# Altium PCB GEARDRONE_F4_3.PcbDoc
Units mil, origin at the board's own origin, x right, y up, seen from the top; angles counter-clockwise.
Board outline 2820.03 x 2817.53 mil, 4 copper layers (Top Layer, GND, VCC, Bottom Layer), stack 33.578 mil thick; 89 components, 49 nets, 337 pads, 88 vias.
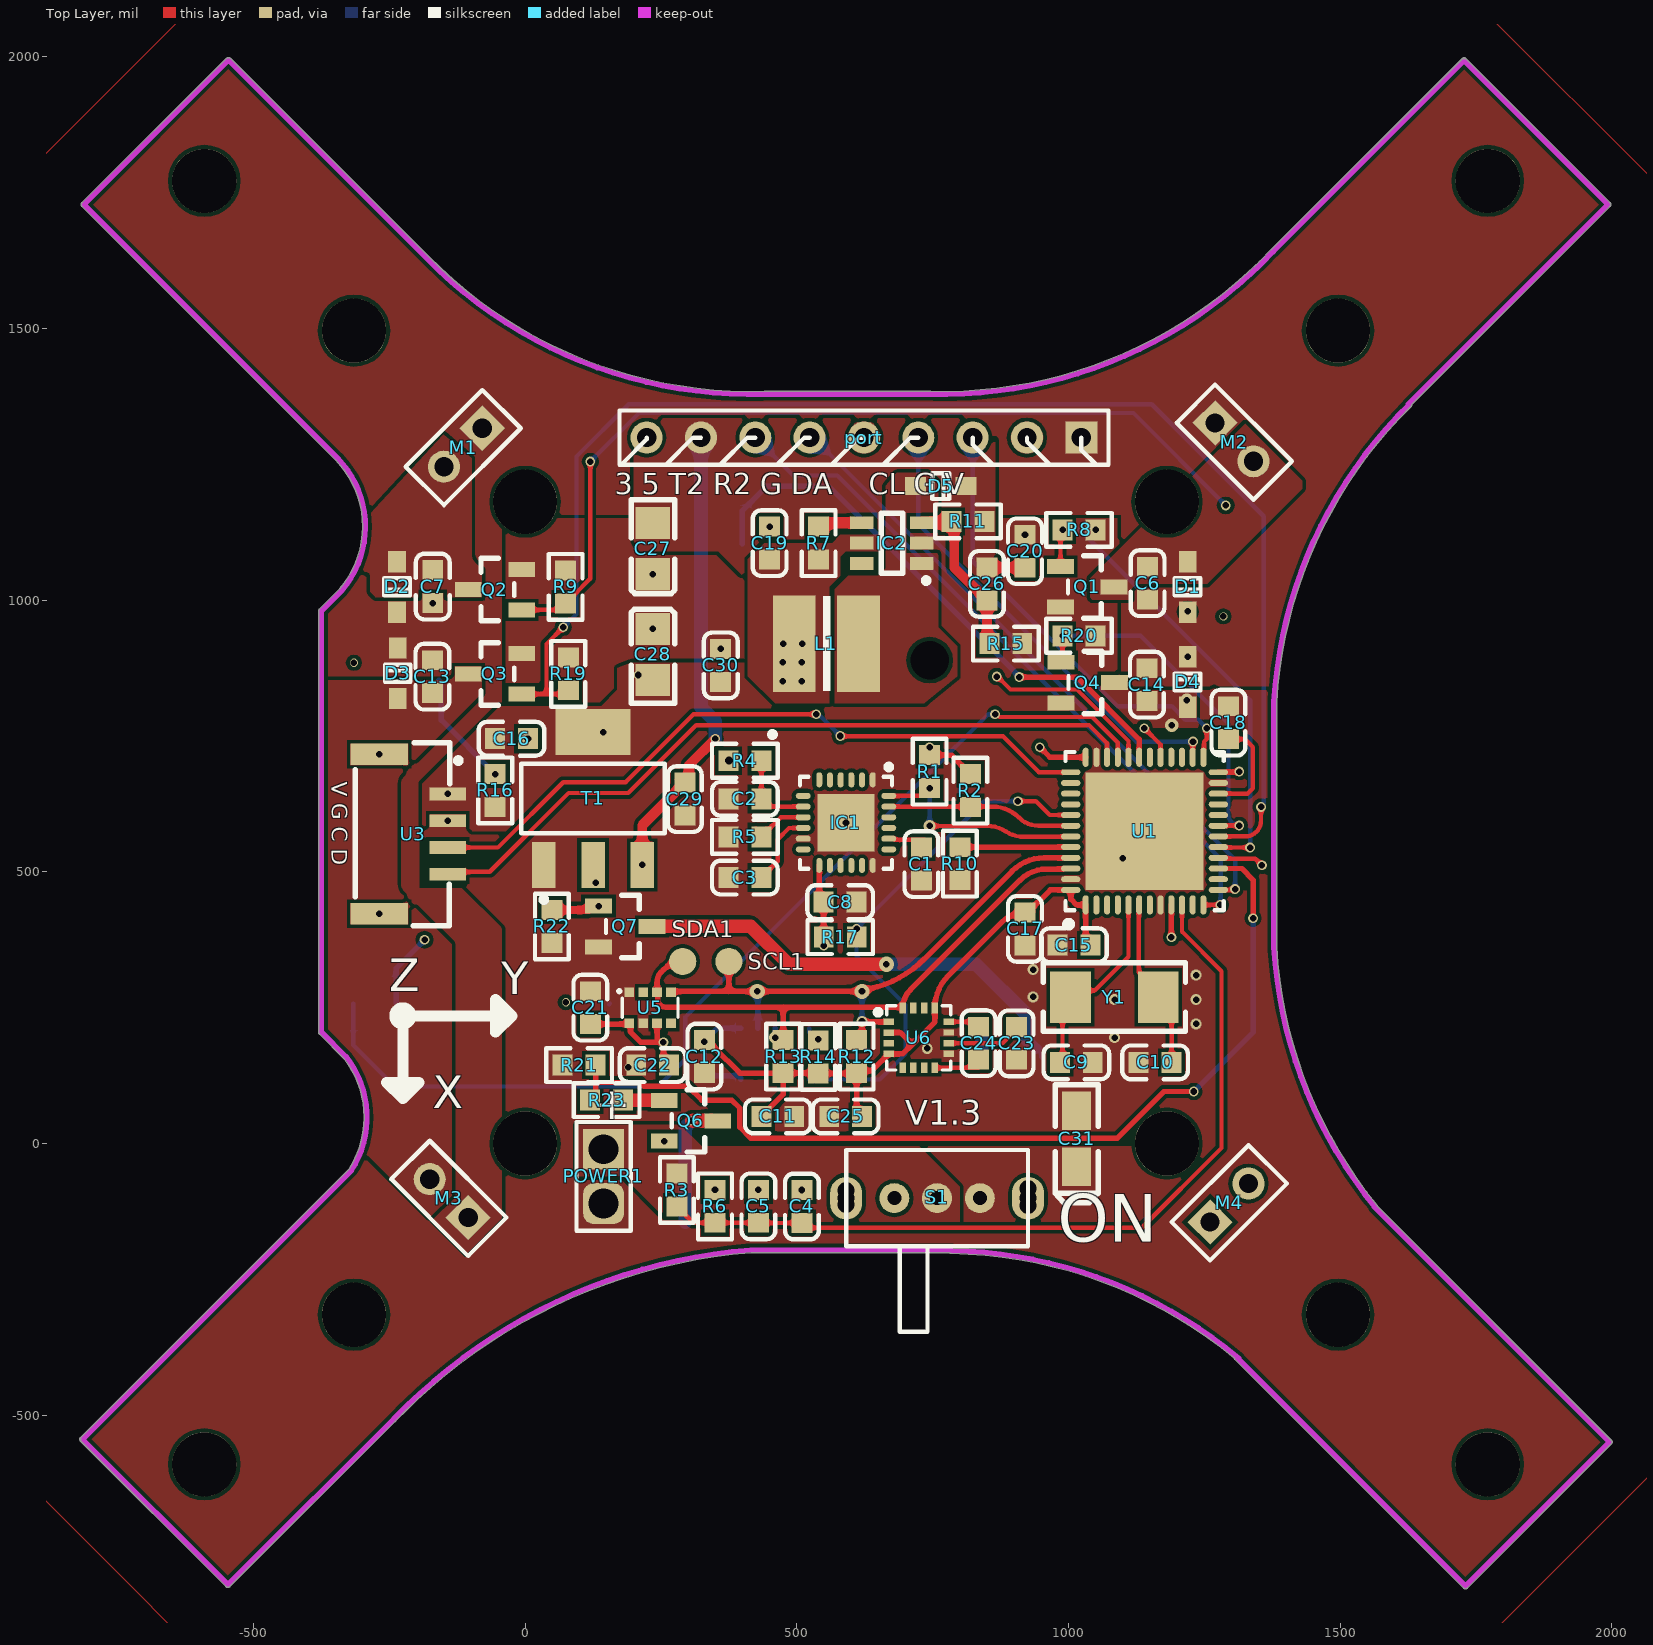
[diagram p0: Top Layer view]
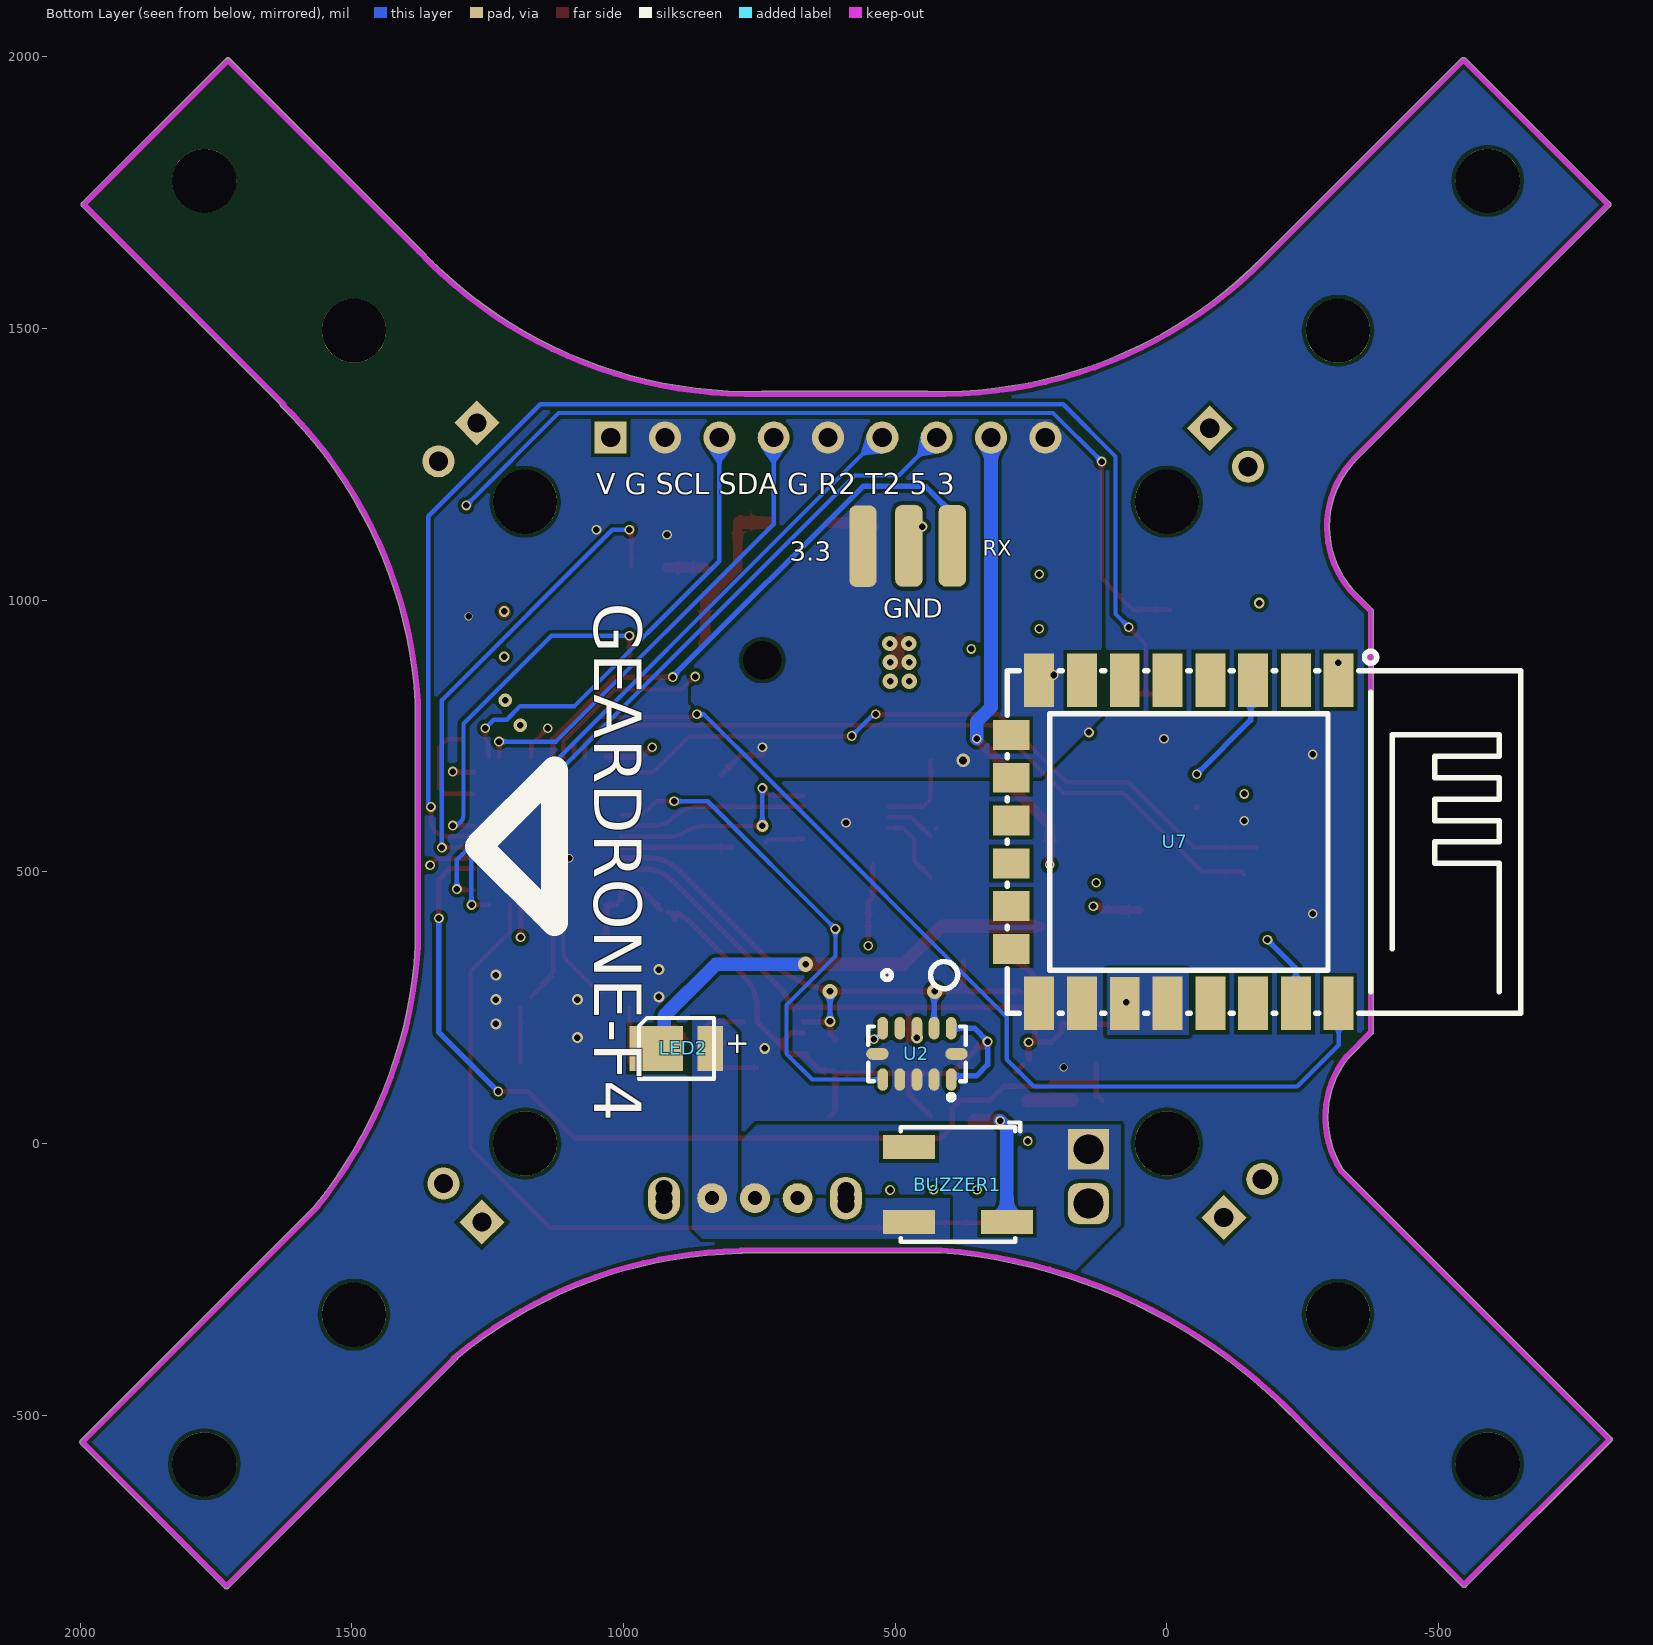
[diagram p1: Bottom Layer view, seen from below]
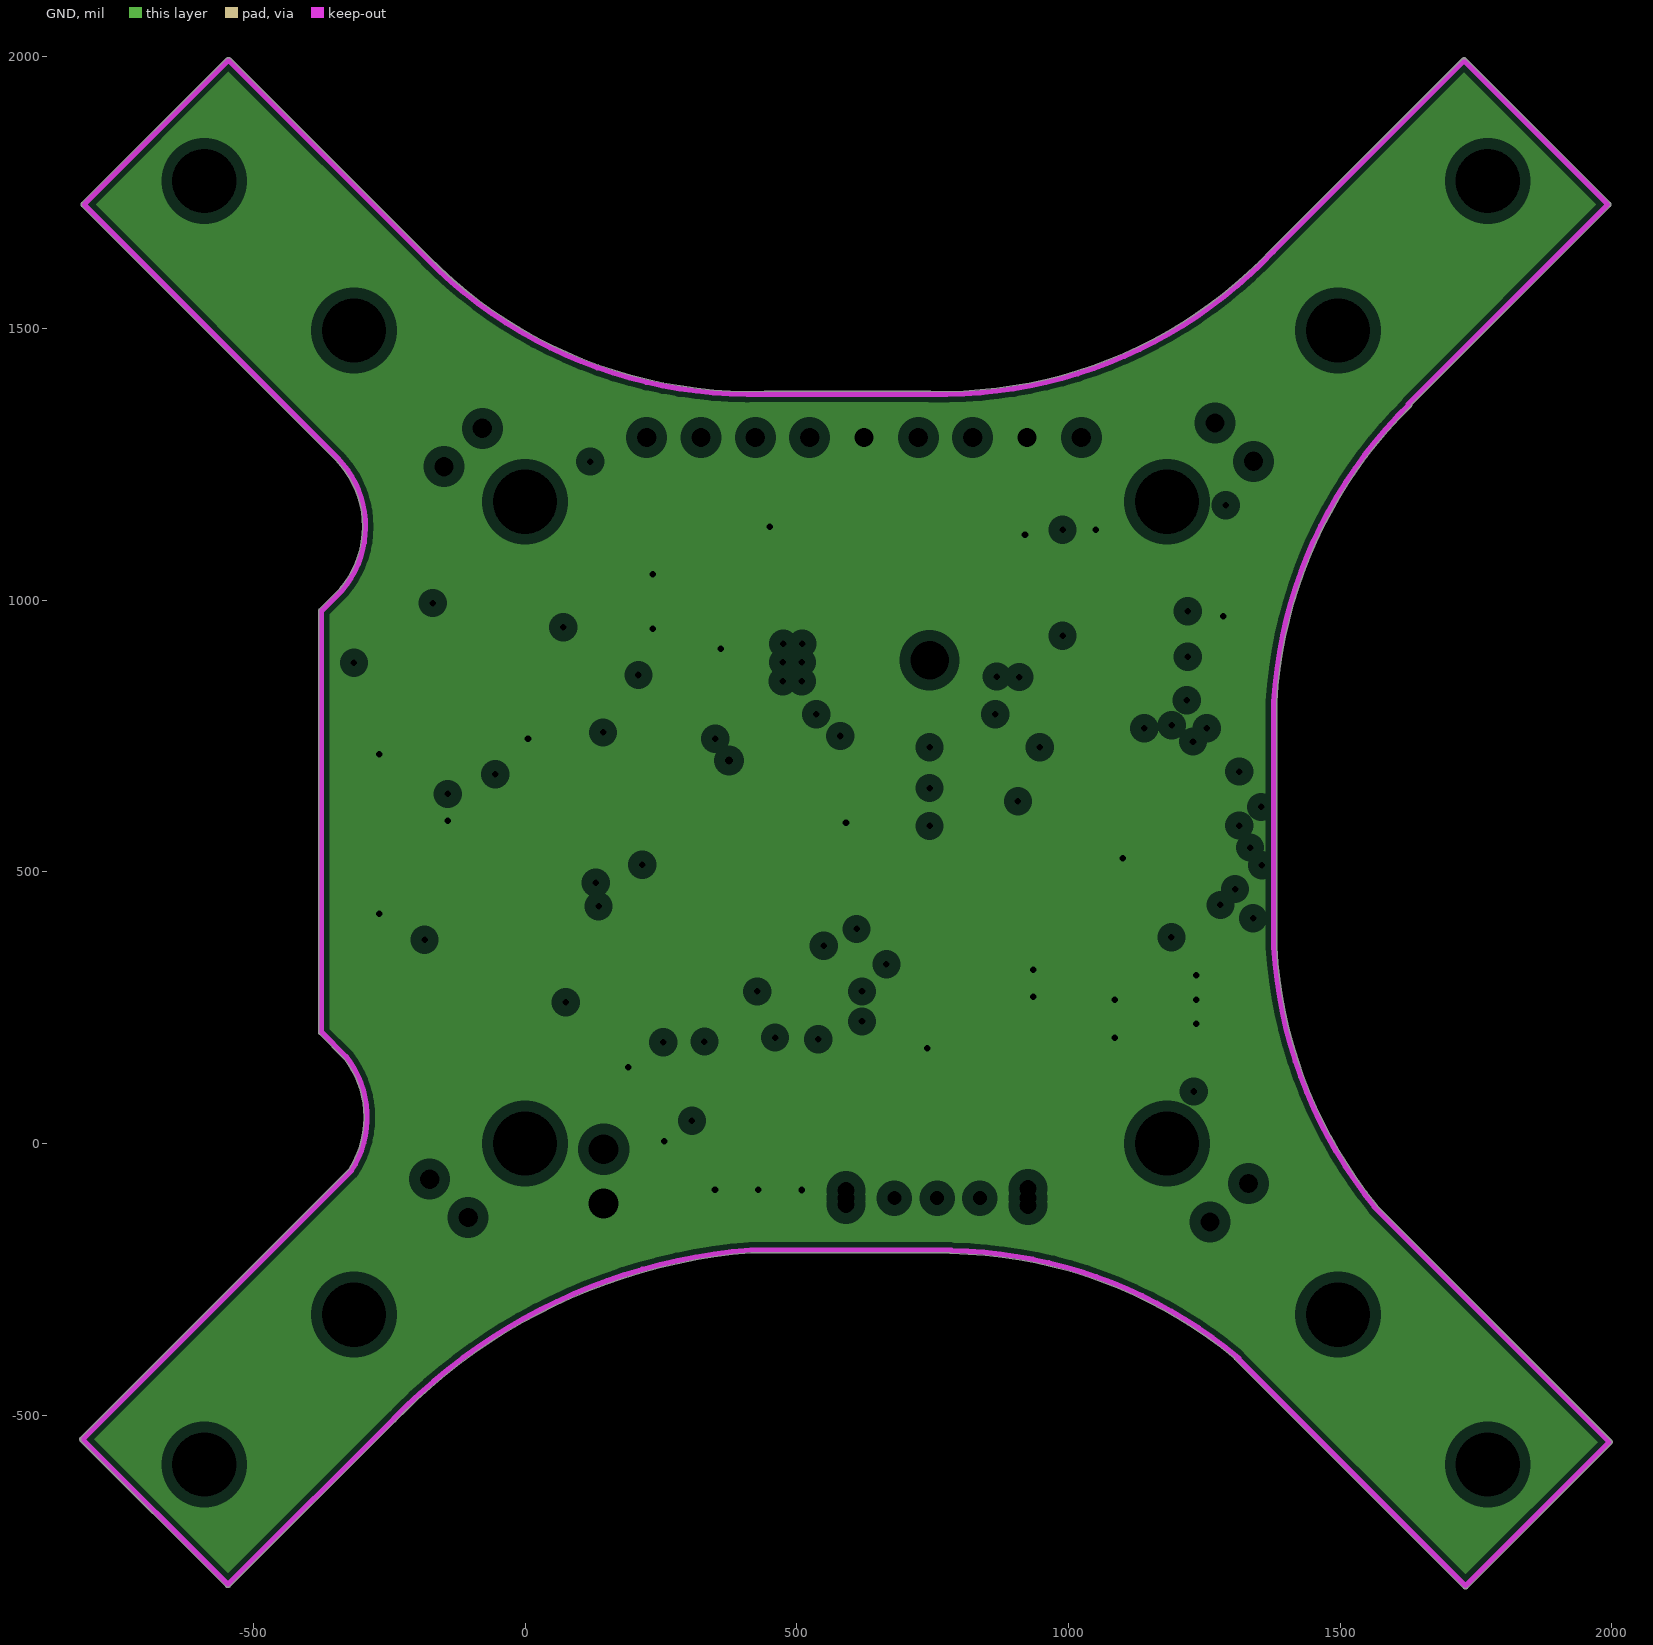
[diagram p2: GND, clearances drawn from the general rule]
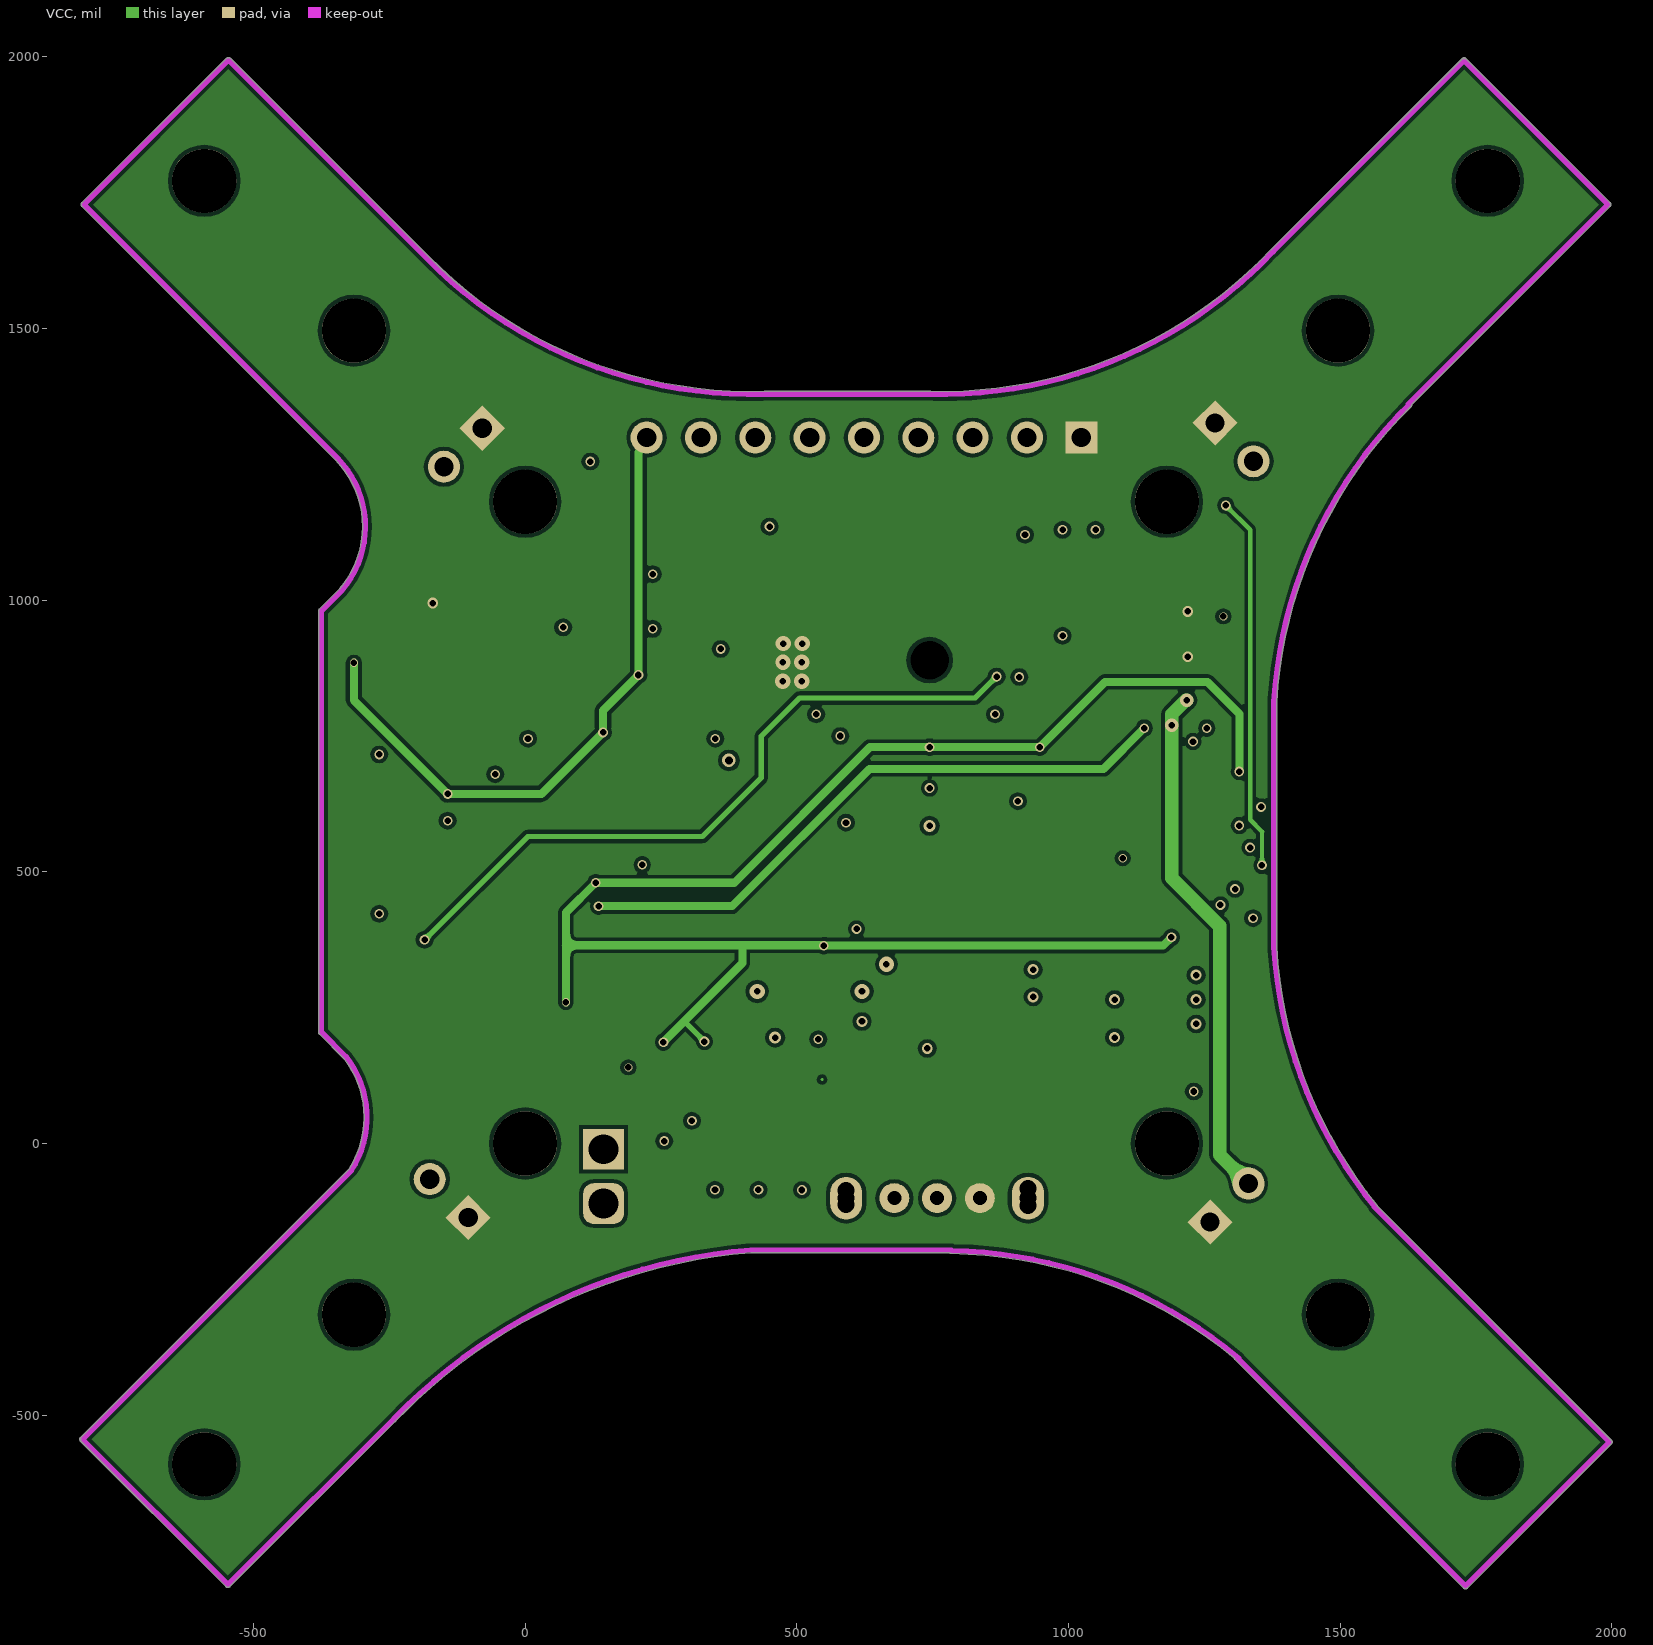
[diagram p3: VCC]
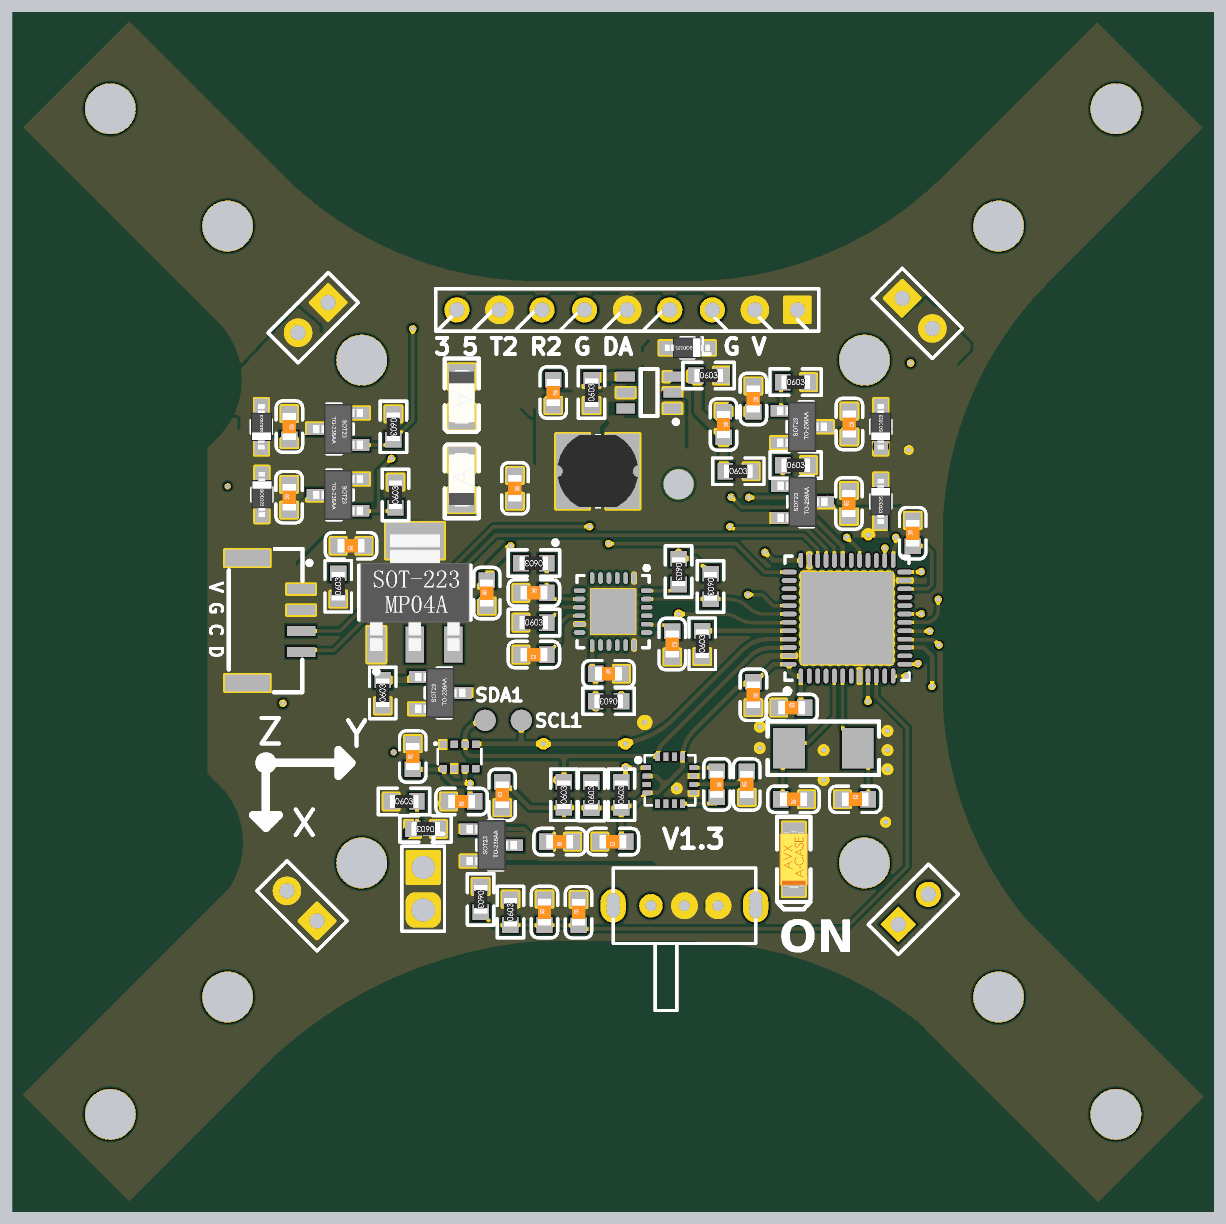
[diagram p4: 3D render of the assembled board from above, using the file's embedded part models]

## Layer stack, top to bottom
Top Solder: solder mask 0.4, Solder Resist, Dk 3.5
Top Layer: signal copper 1.4
Dielectric 2: prepreg 2.8, PP-006, Dk 4.1
GND: plane copper 1.378, net GND
Dielectric 1: dielectric 12.6, FR-4, Dk 4.8
VCC: signal copper 1.4
Dielectric2: dielectric 12.6, FR-4, Dk 4.8
Bottom Layer: signal copper 1.4
Bottom Solder: solder mask 0.4, Solder Resist, Dk 3.5

## Board outline
-817.99,-547.99 -550.49,-815.49 ccw(c-546.95,-811.95) -543.39,-815.48 -543.4,-815.49 -239.64,-511.73 ccw(c-241.98,-507.29) -238.36,-510.77 cw(c495.51,-1214.51) -223.45,-495.55 ccw(c-227,-492) -223.43,-495.52 cw(c495.51,-1214.51) 415.07,-200.93 780.57,-200.93 ccw(c783.92,-197.2) 783.84,-202.21 cw(c769.8,-1041.73) 1305.28,-395.01 ccw(c1310.21,-394.11) 1306.67,-397.66 1727.01,-817.99 ccw(c1730.55,-814.45) 1734.11,-817.98 1999.08,-553.01 ccw(c1995.55,-549.45) 2000.57,-549.45 ccw(c1995.55,-549.45) 1999.08,-545.89 1999.1,-545.9 1568.4,-115.21 ccw(c1563.47,-116.13) 1567.37,-112.97 cw(c2213.15,411.02) 1382.97,361.99 1382.97,812.09 cw(c2213.15,763.05) 1630.06,1356.02 ccw(c1626.55,1359.6) 1631.56,1359.47 1996.6,1724.51 1996.58,1724.49 ccw(c1993.05,1728.05) 1998.07,1728.05 ccw(c1993.05,1728.05) 1996.58,1731.61 1996.6,1731.6 1731.6,1996.6 ccw(c1728.05,1993.05) 1724.49,1996.58 1724.51,1996.6 cw(c1728.05,1993.05) 1731.61,1996.58 1724.51,1996.6 1374.03,1646.12 ccw(c1376.41,1641.71) 1372.77,1645.15 cw(c767.58,2215.55) 746.61,1384.19 ccw(c745.61,1379.27) 745.61,1384.29 440.29,1384.29 ccw(c440.29,1379.27) 440.14,1384.29 cw(c415.55,2215.55) -177.4,1632.44 cw(c415.55,2215.55) -177.42,1632.46 ccw(c-181,1628.95) -177.47,1632.51 -177.45,1632.49 cw(c-181,1628.95) -177.4,1632.44 -177.45,1632.49 -541.55,1996.6 -541.54,1996.58 ccw(c-545.1,1993.05) -545.1,1998.07 -546.95,1998.07 ccw(c-546.95,1993.05) -550.51,1996.58 -550.49,1996.6 -550.51,1996.58 -815.48,1731.61 -815.49,1731.6 ccw(c-811.95,1728.05) -815.48,1724.49 -815.49,1724.51 -347.99,1257.01 -348.03,1257.05 cw(c-474.87,1135.24) -299.02,1135.24 cw(c-474.87,1135.24) -341.19,1021 ccw(c-337.37,1017.74) -341.5,1020.59 -378.55,983.55 -378.53,983.56 ccw(c-375,980) -380.01,980 -380.01,205 ccw(c-375,205) -378.53,201.44 -378.55,201.45 -333.26,156.17 cw(c-471.95,48.05) -296.1,48.05 cw(c-471.95,48.05) -323.84,-46.74 -817.99,-540.9 ccw(c-814.45,-544.45) -817.98,-548.01 -817.99,-547.99 cw(c-814.45,-544.45)

## Design rules (kind name [scope] priority, off if disabled: settings)
Clearance [All] p1: gap=7 ignorepadtopadclearanceinfootprint=FALSE
PlaneClearance [All] p1: clearance=20
PlaneConnect [All] p1: planeconnectstyle=Direct reliefexpansion=20 reliefentries=4 reliefconductorwidth=10 reliefairgap=10
PolygonConnect [All] p1: connectstyle=Direct reliefconductorwidth=10 reliefentries=4 polygonreliefangle="90 Angle" airgapwidth=10
RoutingVias [All] p1: holewidth=12 width=18 viastyle="Through Hole" minholewidth=12 minwidth=18 maxholewidth=28 maxwidth=50
SolderMaskExpansion [All] p1: expansion=4 istentingtop=FALSE
Width [All] p1: maxlimit=30 minlimit=8 preferedwidth=8 minimp=50.000000 maximp=50.000000 favimp=50.000000
28 further rules are at their usual default settings.

## Components (designator, comment, footprint, x,y, rotation, side; value= is the part's Value field where it differs from the comment)
3.3 "TestPoint" TestPoint#1 559.45,1099.45 r90 bottom
BUZZER1 "MLT-5020" BUZ-SMD_3P-L5.2-W5.2-P3.50-BR 384.45,-75.55 r90 bottom
C1 "2.2nf" 0603_C 729.45,514.13 r270 top value=2.2nF
C2 "10nf" 0603_C 404.45,634.45 r0 top value=10nF
C3 "104" 0603_C 404.45,489.45 r180 top
C4 "104" 0603_C 509.45,-115.87 r90 top
C5 "106" 0603_C 429.45,-115.55 r90 top
C6 "104" 0603_C 1145.55,1031.23 r270 top
C7 "104" 0603_C -170,1025 r270 top
C8 "104" 0603_C 579.76,444.45 r0 top
C9 "22pf" 0603_C 1014.45,149.45 r180 top value=22pF
C10 "22pF" 0603_C 1159.45,149.45 r0 top
C11 "4.7uf" 0603_C 465,50 r180 top value=4.7uF
C12 "0.1uf" 0603_C 330,160 r90 top value=0.1uF
C13 "104" 0603_C -170.55,859.13 r90 top
C14 "104" 0603_C 1144.45,844.45 r90 top
C15 "104" 0603_C 1010,365 r0 top
C16 "104" 0603_C -25,745 r180 top
C17 "104" 0603_C 920,395 r270 top
C18 "4.7uf" 0603_C 1294.45,774.45 r90 top
C19 "22uf" 0603_C 450,1105 r270 top value=22uF
C20 "22uf" 0603_C 920,1090 r270 top value=22uF
C21 "104" 0603_C 120,250 r90 top
C22 "104" 0603_C 234.76,144.45 r180 top
C23 "4.7uf" 0603_C 904.45,184.45 r90 top
C24 "0.22uf" 0603_C 834.43,184.62 r270 top
C25 "104" 0603_C 590,50 r180 top
C26 "15pf" 0603_C 850,1030 r270 top value=15pF
C27 "10uf" TAN-A-3216 235,1095 r270 top
C28 "10uf" TAN-A-3216 235,900 r90 top
C29 "104" 0603_C 293.94,633.84 r90 top value=0.1uF
C30 "104" 0603_C 360,880 r270 top value=0.1uF
C31 "100uf" CASE-A_3216 1015,8.43 r270 top
D1 "B5817WS" SOD-323 1219.45,1024.57 r90 top
D2 "B5817WS" SOD-323 -235.55,1024.45 r90 top
D3 "B5817WS" SOD-323 -234.45,865.55 r270 top
D4 "B5817WS" SOD-323 1219.45,849.45 r270 top
D5 "B5817WS" SOD-323 765,1210 r180 top
GND "TestPoint" TestPoint#1 475,1100 r90 bottom
IC1 "MPU6050" LC-QFN-24_4x4x05P 590.55,590.55 r180 top
IC2 "SX1308" LC-SOT-23-6 675,1105 r0 top
L1 "4.7uH" CD43NP 555,920 r0 top
LED2 "EFD3-G9CA-P1WF" LED3528 890,175 r180 bottom
M1 "Header 2" HDR1X2#1 -78.74,1316.26 r225 top
M2 "Header 2" HDR1X2#1 1269.84,1326.26 r315 top
M3 "Header 2" HDR1X2#1 -104.84,-136.26 r135 top
M4 "Header 2" HDR1X2#1 1260.55,-144.45 r45 top
port "Header 9" HDR1X9 1023.62,1299.21 r180 top
POWER1 "Header 2" HDR1X2#2 144.45,-10.55 r270 top
Q1 "SI2302" LC-SOT-23(SOT-23-3) 1034.45,1024.57 r180 top
Q2 "SI2302" LC-SOT-23(SOT-23-3) -55.55,1019.45 r0 top
Q3 "SI2302" LC-SOT-23(SOT-23-3) -55.55,864.45 r0 top
Q4 "SI2302" LC-SOT-23(SOT-23-3) 1035.55,848.35 r180 top
Q6 "SI2302" LC-SOT-23(SOT-23-3) 305.24,41.85 r180 top
Q7 "SI2302" LC-SOT-23(SOT-23-3) 184.45,399.45 r180 top
R1 "10k" 0603_R 744.45,684.45 r270 top value=10KΩ
R2 "10k" 0603_R 819.45,649.45 r270 top value=10KΩ
R3 "10k" 0603_R 279.45,-85.55 r270 top value=10KΩ
R4 "0" 0603_R 404.45,704.45 r180 top value=0Ω
R5 "0" 0603_R 404.45,564.45 r0 top value=0Ω
R6 "10k" 0603_R 349.45,-115.55 r90 top value=10KΩ
R7 "100k" 0603_R 540,1105 r90 top value=100KΩ
R8 "10k" 0603_R 1019.45,1129.45 r0 top value=10KΩ
R9 "10k" 0603_R 74.45,1024.45 r270 top value=10KΩ
R10 "10kΩ" 0603_R 800,515 r90 top value=10KΩ
R11 "73.2k" 0603_R 815,1145 r0 top value=73.2KΩ
R12 "10k" 0603_R 610,160 r90 top value=10KΩ
R13 "10k" 0603_R 475,160 r90 top value=10KΩ
R14 "10k" 0603_R 539.45,159.45 r90 top value=10KΩ
R15 "10k" 0603_R 884.68,920 r0 top value=10KΩ
R16 "10k" 0603_R -55,650 r90 top value=10KΩ
R17 "10k" 0603_R 580,380 r180 top value=10KΩ
R19 "10k" 0603_R 79.45,864.45 r90 top value=10KΩ
R20 "10k" 0603_R 1019.45,934.45 r0 top value=10KΩ
R21 "10k" 0603_R 99.45,144.45 r0 top value=10KΩ
R22 "10k" 0603_R 49.45,399.45 r90 top value=10KΩ
R23 "1K" 0603_R 150,80 r180 top value=1KΩ
RX "TestPoint" TestPoint#2 395,1100 r180 bottom
S1 "SW-SPDT" 8.5*3.5_3P 758.19,-98.58 r0 top
SCL1 "TestPoint" TestPoint#3 375,335 r90 top
SDA1 "TestPoint" TestPoint#3 290,335 r90 top
T1 "AMS1117-3.3" SOT-223 125,635 r0 top
U1 "STM32F411CEU6" UFQFPN-48_L7.0-W7.0-P0.50-BL-EP 1139.99,575 r0 top
U2 "VL53L0CXV0DH/1" OPTO-SMD_12P_VL53L0CXV0DH-1 460,165 r180 bottom
U3 "SM04B-GHS-TB(LF)(SN)" CONN-SMD_4P-P1.25_SM04B-GHS-TB-LF-SN -205.55,569.45 r270 top
U5 "SPL06-001" SENSOR-SMD_SPL06-001 230,250 r180 top
U6 "QMC5883L" LPCC-16_L3.0-W3.0-P0.50-BL 724.45,194.45 r270 top
U7 "ESP-12F(ESP8266MOD)" WIFIM-SMD_ESP-12F-ESP8266MOD -15,555 r0 bottom locked
Y1 "25MHZ 5032" SMD-5032_2P 1084.45,269.45 r180 top

## Footprints (in the part's own frame and the unit in brackets; to place one, negate y for a bottom-side part, rotate by r counter-clockwise, add the part's x,y. Pads: shape width x height; smd on the part's side, far side on the other; paste and mask are expansions set on the pad)
8.5*3.5_3P [mm]
  round 1.4 hole 0.65: 1(2,-0.05) 2(0,-0.05) 3(-2,-0.05)
  oval 1.5x2 hole 0.8: 4(-4.25,-0.05) 5(4.25,-0.05)
  round 0.8 hole 0.8: 18(-4.25,0.3) 19(-4.25,-0.35) 20(4.25,0.4) 21(4.25,-0.4)
  silkscreen extent -4.25,-6.3 4.25,2.2
0603_C [mm]
  rect 0.93x0.98 smd: 1(-0.77,0) 2(0.77,0)
  silkscreen extent -1.53,-0.79 1.54,0.79, body extent -0.8,-0.4 0.8,0.4, height 0.3
0603_R [mm]
  rect 0.93x0.98 smd: 1(-0.77,0) 2(0.77,0)
  silkscreen extent -1.53,-0.79 1.54,0.79, body extent -0.85,-0.4 0.85,0.4, height 0.56
BUZ-SMD_3P-L5.2-W5.2-P3.50-BR [mm]
  rect 1.12x2.425 smd: 1(1.75,2.288) 2(-1.75,2.288) 3(-1.75,-2.287)
  silkscreen extent -2.68,-2.9 2.9,2.68
CASE-A_3216 [mm]
  rect 1.8x1.35 smd: 1(1.31,0) 2(-1.31,0)
  silkscreen extent -2.54,-1 2.97,1, body extent -1.7,-0.84 1.7,0.84, height 1.71
CD43NP [mm] "功率电感"
  rect 2x4.5 smd: 1(-1.512,0) 2(1.488,0)
  silkscreen extent -0.17,-2.21 0.17,2.24, body extent -2.41,-2.14 2.39,2.16, height 3.5
CONN-SMD_4P-P1.25_SM04B-GHS-TB-LF-SN [mm]
  rect 0.6x1.7 smd: 1(-1.876,1.6) 2(-0.626,1.6) 3(0.624,1.6) 4(1.875,1.6)
  rect 1x2.7 smd: 5(3.725,-1.6) 6(-3.725,-1.6)
  silkscreen extent -4.27,-2.71 4.28,2.22
HDR1X2#1 [mm] "Connector; Header; 2 Position"
  rect 1.5x1.5 hole 0.9: 1(0,0)
  round 1.5 hole 0.9: 2(2.54,0)
  silkscreen extent -1.27,-1.27 3.81,1.27
HDR1X2#2 [mm] "Connector; Header; 2 Position"
  rect 1.905x1.905 hole 1.397: 1(0,0)
  rrect50% 1.905x1.905 hole 1.397: 2(2.54,0)
  silkscreen extent -1.27,-1.27 3.81,1.27
HDR1X9 [mm] "Connector; Header; 9 Position"
  rect 1.5x1.5 hole 0.9: 1(0,0)
  round 1.5 hole 0.9: 2(2.54,0) 3(5.08,0) 4(7.62,0) 5(10.16,0) 6(12.7,0) 7(15.24,0) 8(17.78,0) 9(20.32,0)
  silkscreen extent -1.27,-1.27 21.59,1.27
LC-QFN-24_4x4x05P [mm]
  rect 2.68x2.68 smd mask+0.051: 0(0,0)
  oval 0.28x0.7 smd mask+0.051: 1(-1.25,-2) 2(-0.75,-2) 3(-0.25,-2) 4(0.25,-2) 5(0.75,-2) 6(1.25,-2) 13(1.25,2) 14(0.75,2) 15(0.25,2) 16(-0.25,2) 17(-0.75,2) 18(-1.25,2)
  oval 0.7x0.28 smd mask+0.051: 7(2,-1.25) 8(2,-0.75) 9(2,-0.25) 10(2,0.25) 11(2,0.75) 12(2,1.25) 19(-2,1.25) 20(-2,0.75) 21(-2,0.25) 22(-2,-0.25) 23(-2,-0.75) 24(-2,-1.25)
  silkscreen extent -2.15,-2.72 2.15,2.15
LC-SOT-23(SOT-23-3) [mm]
  rect 1.25x0.7 smd: 1(1.25,-0.95) 2(1.25,0.95) 3(-1.25,0)
  silkscreen extent -0.65,-1.46 0.9,1.46, body extent -1.5,-1.5 1.5,1.5, height 1.3
LC-SOT-23-6 [mm]
  rect 1.1x0.6 smd: 1(1.4,-0.95) 2(1.4,0) 3(1.4,0.95) 4(-1.4,0.95) 5(-1.4,0) 6(-1.4,-0.95)
  silkscreen extent -0.5,-1.87 1.73,1.4
LED3528 [mm]
  rect 2.5x2.1 smd: 1(-1.257,0)
  rect 1.2x2.1 smd: 2(1.257,0)
  silkscreen extent -2.07,-1.42 1.44,1.42, body extent -2.09,-1.4 1.41,1.4, height 1.8
LPCC-16_L3.0-W3.0-P0.50-BL [mm]
  rect 0.3x0.5 smd: 1(-0.749,-1.4) 2(-0.249,-1.4) 3(0.251,-1.4) 4(0.751,-1.4) 9(0.75,1.4) 10(0.25,1.4) 11(-0.25,1.4) 12(-0.751,1.4)
  rect 0.5x0.3 smd: 5(1.4,-0.748) 6(1.4,-0.248) 7(1.4,0.252) 8(1.4,0.752) 13(-1.4,0.752) 14(-1.4,0.252) 15(-1.4,-0.248) 16(-1.4,-0.748)
  silkscreen extent -1.5,-2.02 1.5,1.5
OPTO-SMD_12P_VL53L0CXV0DH-1 [mm]
  oval 0.5x1.049 smd: 1(1.6,-1.199) 2(0.8,-1.199) 3(0,-1.199) 4(-0.8,-1.199) 5(-1.6,-1.199) 7(-1.6,1.199) 8(-0.8,1.199) 9(0,1.199) 10(0.8,1.199) 11(1.6,1.199)
  oval 1.049x0.55 smd: 6(-1.849,0) 12(1.849,0)
  VCC circle w0.06: c-2.2,-1.2 r0.03
  silkscreen extent -2.28,-2.15 2.28,1.28
SENSOR-SMD_SPL06-001 [mm]
  rect 0.45x0.45 smd: 1(0.975,-0.725) 2(0.325,-0.725) 3(-0.325,-0.725) 4(-0.975,-0.725) 5(-0.975,0.725) 6(-0.325,0.725) 7(0.325,0.725) 8(0.975,0.725)
  silkscreen extent -1.3,-0.84 1.51,0.45
SMD-5032_2P [mm]
  rect 1.9x2.4 smd: 1(-2.05,0) 2(2.05,0)
  silkscreen extent -3.32,-1.6 3.32,1.6
SOD-323 [mm]
  rect 1x0.83 smd: 1(1.18,0) 2(-1.18,0)
  silkscreen extent -0.4,-0.6 0.4,0.6, body extent -1.35,-0.62 1.35,0.63, height 1.1
SOT-223 [mm]
  rect 1.1x2.15 smd: 1(-2.3,-3.1) 2(0,-3.1) 3(2.3,-3.1)
  rect 3.5x2.15 smd: 2(0,3.1)
  silkscreen extent -3.35,-4.85 3.35,1.63, body extent -3.25,-3.48 3.25,3.48, height 1.7
TAN-A-3216 [mm]
  rect 1.5x1.6 smd: 1(-1.2,0) 2(1.2,0)
  silkscreen extent -2.29,-1.02 2.11,1.02, body extent -1.6,-0.8 1.6,0.8, height 1.6
TestPoint#1 [mil]
  rrect50% 150x50 smd: 1(0,0)
TestPoint#2 [mil]
  rrect50% 50x150 smd: 1(0,0)
TestPoint#3 [mil]
  round 50 smd: 1(0,0)
UFQFPN-48_L7.0-W7.0-P0.50-BL-EP [mm]
  oval 0.28x0.9 smd: 1(-2.751,-3.449) 2(-2.25,-3.449) 3(-1.75,-3.449) 4(-1.25,-3.449) 5(-0.749,-3.449) 6(-0.249,-3.449) 7(0.249,-3.449) 8(0.749,-3.449) 9(1.25,-3.449) 10(1.75,-3.449) 11(2.251,-3.449) 12(2.751,-3.449) 25(2.751,3.449) 26(2.251,3.449) 27(1.75,3.449) 28(1.25,3.449) 29(0.749,3.449) 30(0.249,3.449) 31(-0.249,3.449) 32(-0.749,3.449) 33(-1.25,3.449) 34(-1.75,3.449) 35(-2.25,3.449) 36(-2.751,3.449)
  oval 0.9x0.28 smd: 13(3.449,-2.751) 14(3.449,-2.25) 15(3.449,-1.75) 16(3.449,-1.25) 17(3.449,-0.749) 18(3.449,-0.249) 19(3.449,0.249) 20(3.449,0.749) 21(3.449,1.25) 22(3.449,1.75) 23(3.449,2.25) 24(3.449,2.751) 37(-3.449,2.751) 38(-3.449,2.25) 39(-3.449,1.75) 40(-3.449,1.25) 41(-3.449,0.749) 42(-3.449,0.249) 43(-3.449,-0.249) 44(-3.449,-0.749) 45(-3.449,-1.25) 46(-3.449,-1.75) 47(-3.449,-2.25) 48(-3.449,-2.751)
  rect 5.5x5.5 smd: 49(0,0)
  silkscreen extent -3.7,-4.5 3.7,3.7
WIFIM-SMD_ESP-12F-ESP8266MOD [mm]
  rect 1.4x2.5 smd: 1(-7.651,-7.551) 2(-5.651,-7.551) 3(-3.651,-7.551) 4(-1.651,-7.551) 5(0.349,-7.551) 6(2.349,-7.551) 7(4.349,-7.551) 8(6.349,-7.551) 9(6.349,7.549) 10(4.349,7.55) 11(2.349,7.551) 12(0.349,7.551) 13(-1.651,7.55) 14(-3.651,7.551) 15(-5.651,7.55) 16(-7.651,7.551)
  rect 1.7x1.4 smd: 17(7.65,-5) 18(7.649,-3.002) 19(7.649,-1.003) 20(7.649,0.998) 21(7.649,2.997) 22(7.65,4.997)
  silkscreen extent -16.15,-8.92 7.85,8

## Part data
BUZZER1: BOM_JLCPCB Part Class="Extended Part", BOM_Manufacturer=HNDZ, BOM_Manufacturer Part=MLT-5020, BOM_Supplier=LCSC, BOM_Supplier Part=C94598, spicePre=B, spiceSymbolName=MLT-5020
C1 C2 C3 C4 C5 C6 C7 C8 C11 C12 C13 C14 C15 C16 C17 C18 C19 C20 C21 C22 C23 C24 C25 C26 C29 C30: library part "Cap Chip 0603", "Polarized Capacitor (Radial)", Published=8-Jun-2000, Publisher="Altium Limited", Revision="July-2002: Re-released for DXP Platform."
C9 C10: library part "Cap Chip 0805", "Polarized Capacitor (Radial)", Published=8-Jun-2000, Publisher="Altium Limited", Revision="July-2002: Re-released for DXP Platform."
C27 C28 C31: library part ECAP
  C27 C28: =10uF
  C31: =100uF
D1 D2 D3 D4 D5: library part DIODE-TVS
IC1: "三轴陀螺仪"
L1: library part "Inductor Chip", "Inductor", Published=8-Jun-2000, Publisher="Altium Limited", Revision="July-2002: Re-released for DXP Platform."
LED2: BOM_JLCPCB Part Class="Extended Part", BOM_Manufacturer=APt, BOM_Manufacturer Part=EFD3-G9CA-P1WF, BOM_Supplier=LCSC, BOM_Supplier Part=C507038, Contributor=LCSC, spicePre=L, spiceSymbolName=EFD3-G9CA-P1WF
M1 M2 M3 M4 POWER1: "Header, 2-Pin", LatestRevisionDate=17-Jul-2002, LatestRevisionNote="Re-released for DXP Platform.", Publisher="Altium Limited"
port: "Header, 9-Pin", LatestRevisionDate=17-Jul-2002, LatestRevisionNote="Re-released for DXP Platform.", Publisher="Altium Limited"
Q1 Q2 Q3 Q4 Q6 Q7: library part HANDSOME-SI2302-N
R1 R2 R3 R4 R5 R6 R7 R8 R9 R10 R11 R12 R13 R14 R15 R16 R17 R19 R20 R21 R22 R23: library part "Resistor Chip 0805", "Resistor", Published=8-Jun-2000, Publisher="Altium Limited", Revision="July-2002: Re-released for DXP Platform."
S1: "SPDT Subminiature Toggle Switch, Right Angle Mounting, Vertical Actuation", Datasheet="Latest Revision: 05-Dec-2000", Published=24-Mar-1999, Publisher="Altium Limited", Revision 1="Jul-2002: Re-released for DXP Platform.", Revision 2="17-Dec-2003: Schematic revised, PCB Footprint replaced."
T1: library part AMS1117-XX, "AMS   800mA LOW DROPOUT VOLTAGE REGULATOR"
U1 U2: BOM_JLCPCB Part Class="Extended Part", BOM_Manufacturer=STMicroelectronics, BOM_Supplier=LCSC, spicePre=U
  U1: BOM_Manufacturer Part=STM32F411CEU6, BOM_Supplier Part=C60420, spiceSymbolName=STM32F411CEU6
  U2: BOM_Manufacturer Part=VL53L0CXV0DH/1, BOM_Supplier Part=C91199, spiceSymbolName=VL53L0CXV0DH/1
U3: BOM_JLCPCB Part Class="Extended Part", BOM_Manufacturer="JST Sales America", BOM_Manufacturer Part=SM04B-GHS-TB(LF)(SN), BOM_Supplier=LCSC, BOM_Supplier Part=C189895, Contributor=LCSC, spicePre=U, spiceSymbolName=SM04B-GHS-TB(LF)(SN)
U5: BOM_JLCPCB Part Class="Extended Part", BOM_Manufacturer=Goertek(歌尔), BOM_Manufacturer Part=SPL06-001, BOM_Supplier=LCSC, BOM_Supplier Part=C2684428, Contributor=LCSC, spicePre=U, spiceSymbolName=SPL06-001
U6: library part HMC5883L, BOM_JLCPCB Part Class="Extended Part", BOM_Manufacturer=null, BOM_Manufacturer Part=HMC5883L, BOM_Supplier=LCSC, BOM_Supplier Part=C2859540, Contributor=LCSC, spicePre=U, spiceSymbolName=HMC5883L
U7: BOM_JLCPCB Part Class="Extended Part", BOM_Manufacturer=Ai-Thinker, BOM_Manufacturer Part=ESP-12F(ESP8266MOD), BOM_Supplier=LCSC, BOM_Supplier Part=C82891, spicePre=U, spiceSymbolName=ESP-12F(ESP8266MOD)
Y1: library part XTAL, "Crystal Oscillator", Frequency=25MHz, Published=8-Jun-2000, Publisher="Altium Limited", Revision="July-2002: Re-released for DXP Platform."

## Free pads (board coordinates)
  round 118.11 hole 118.11: 10(0,0) 10(0,1181.1) 10(1181.1,0) 10(1181.1,1181.1) M3(-590.55,-590.55) M3(-590.55,1771.65) M3(-314.96,-314.96) M3(-314.96,1496.06) M3(1496.06,-314.96) M3(1496.06,1496.06) M3(1771.65,-590.55) M3(1771.65,1771.65)
  round 59.06 hole 70.87: 11(744.45,889.45)

## Via types
v1: diameter 18, hole 12, Top Layer to Bottom Layer, 57 vias
v2: diameter 20, hole 12, Top Layer to Bottom Layer, 12 vias
v3: diameter 28, hole 12, Top Layer to Bottom Layer, 9 vias
v4: diameter 15, hole 12, Top Layer to Bottom Layer, 5 vias
v5: diameter 25, hole 12, Top Layer to Bottom Layer, 2 vias
v6: diameter 22, hole 12, Top Layer to Bottom Layer, 2 vias
v7: diameter 25, hole 15, Top Layer to Bottom Layer, 1 vias

## Nets (pads, with @x,y where several pads share a name; then routed paths per layer and width w, separated by ;. In a path a pad name is that pad's centre, name@x,y a point inside that pad or via, vN(x,y) a via of type N, cw(c..) or ccw(c..) an arc to the next point about the centre after c; other vN are vias at no path point)
3.3: 3.3.1 C8.1 C11.2 C12.2 C15.2 C16.2 C17.1 C21.1 C22.1 C25.1 C28.1 C30.2 IC1.13 port.9 R1.1 R2.1 R4.2 R12.1 R13.1 R14.1 R16.1 R17.2 T1.2 U1.1 U1.9 U1.24 U1.36 U1.48 U2.1 U2.11 U3.1 U5.6 U5.8 U6.2 U6.4 U6.13 U7.1 U7.8 U7.11 U7.12 | length 6439
  Top Layer w10: R16.1@-55.98,619.69 R16.1 R16.1@-54.02,619.69 ; C21.1@110,219.68 C21.1 189.84,219.68 U5.8 193.99,219.08 193.99,204.91 212.32,186.58 240,186.58 ; U5.6 242.8,189.37 240,186.58 ; C22.1@254.45,154.45 v1(254.45,186.58) 240,186.58 ; C22.1 C22.1@277.22,132.31 ; C12.2@330,186.58 339.57,177.01 347.99,177.01 395.32,129.69 425,129.69 ; 424.13,128.82 425,129.69 ; C11.2 434.69,50.98 447.99,64.29 448.98,64.29 475,90.31 R13.1 ; IC1.13 541.34,452.56 C8.1 549.45,380.24 R17.2 ; C25.1 610,60.31 R12.1 ; U6.2 690.76,204.24 712.5,182.5 ; v1(744.45,729.45) R1.1 784.45,714.76 805.16,694.06 805.16,693.07 818.46,679.76 R2.1 ; C17.1@905.71,412.01 905.71,416.06 C17.1@907.67,418.02 ; C17.1 ccw(c920,365.72) 877.86,407.86 778.44,308.44 ccw(c837.33,249.56) U6.13 754.05,224.06 712.5,182.5 ; C17.1@930.88,430.89 966.7,466.7 U1.48 1004.2,449.7 1014.7,439.19 U1.1 C15.2@1031.7,376.7 ; v1(947.28,729.45) 965.84,710.89 1031.23,710.89 1031.32,710.79 U1.36 ; U1.9 1189.2,379.7 v1(1189.45,379.45) ; U1.24 1276,683.5 1313.5,683.5 v1(1314.45,684.45) ; 425,129.69 R13.1 ; R13.1 538.9,129.69 R14.1 609.45,129.13 R12.1 ; R12.1 614.27,133.96 638.43,133.96 664.5,160.02 664.5,163.96 665.4,164.87 U6.4 694.86,164.87 712.5,182.5
  Top Layer w15: port.9@217.84,1305 port.9
  VCC w10: 293.94,226.06 293.94,223.81 v1(330,187.75)
  VCC w15: v4(-315,884.68) -315,815.71 v1(-142.58,643.29) 30,643.29 v1(143.36,756.64) ; v4(75,260) 75,365 ; v1@143.36,765 143.36,797 v1(208.63,862.27) 208.63,1272.3 223.62,1287.29 port.9 ; v1(254.45,186.58) 293.94,226.06 399.93,332.05 399.93,364.93 400,365 ; v1@550,364.45 1174.45,364.45 v1(1189.45,379.45) ; v1@550,365 400,365 ; v1(1314.45,684.45) 1314.45,790.55 1255.55,849.45 1067.28,849.45 v1(947.28,729.45) v1(744.45,729.45) 634.45,729.45 385,480 v1(130,480) 75,425 75,365 ; 75,365 400,365
  Bottom Layer w10: U2.1 397.01,119.98 392.53,124.45 350.55,124.45 330,145 v1(330,187.75) 354.48,212.22 U2.11
  other v1: 549.69,364.13
  other v7: 375,705
5V: C20.2 C26.1 C27.1 C29.2 D5.2 port.8 R11.2 T1.3 | length 930.8
  Top Layer w18: v1(215.55,512.95) 215.55,585.77 283.65,653.87 283.65,654.85 297.65,668.86 C29.2@298.64,668.86 ; C29.2 C29.2@298.64,668.86 ; v1(350,745) 301.44,696.44 301.44,671.66 C29.2@298.64,668.86 ; C26.1@850.32,1060.63 C26.1 919.37,1060.31 C20.2
  Bottom Layer w25: port.8 323.62,803.02 350,776.64 v1(350,745)
BUZZER: R21.2 R23.2 U1.15 | length 1775.5
  Top Layer w10: R23.2 129.76,90.08 129.76,112.37 ; R21.2 129.76,112.37 ; v1(1230.73,95.73) 1175.73,95.73 1090,10 415,10 395,30 395,65 380,80 325.12,80 300.08,105.03 219.15,105.03 211.81,112.37 129.76,112.37 ; U1.15 1318.9,506.1 1340,485 1340,415 v1(1339.69,414.69)
  Bottom Layer w10: v1(1230.73,95.73) 1339.69,204.69 v1(1339.69,414.69)
CLK: U1.37 U3.3 | length 1316.9
  Top Layer w8: U3.3@-164.23,544.87 -50.13,544.87 70,665 185,665 310,790 v1(535.62,790) ; v1(580,750) 580.55,749.45 879.45,749.45 945.6,683.3 U1.37
  VCC w8: v1@578.09,751.91 v1(580,750)
  Bottom Layer w8: v1(535.62,790) 538.33,790 542.99,785.34 544.66,785.34 v1(580,750)
DIO: U1.34 U3.4 | length 1366.9
  Top Layer w8: U3.4 -138.23,500 -65,500 80,645 190,645 315,770 1037.68,770 1071.1,736.58 U1.34
GND: C1.2 C2.1 C3.2 C4.2 C5.2 C8.2 C9.1 C10.1 C11.1 C12.1 C15.1 C16.1 C17.2 C18.2 C19.1 C20.1 C21.2 C22.2 C23.1 C25.2 C27.2 C28.2 C29.1 C30.1 C31.2 GND.1 IC1.0 IC1.1 IC1.11 IC1.18 IC2.2 port.2 port.5 POWER1.2 Q1.2 Q2.2 Q3.2 Q4.2 Q6.2 Q7.2 R5.1 R6.2 R8.2 R9.1 R10.1 R15.2 R19.2 R20.2 R21.1 R22.1 T1.1 U1.8 U1.23 U1.35 U1.47 U1.49 U2.2 U2.3 U2.4 U2.6 U2.12 U3.2 U3.5 U3.6 U5.1 U5.7 U6.9 U6.11 U7.9 U7.10 | length 1.8
  Bottom Layer w8: U7.10@155,256.51 U7.10
  other v1: 509.45,-85.55 349.45,-85.24 429.45,-85.24 256.02,4.45 -268.53,422.81 590.55,590.55 -142.58,594.08 -268.53,716.09 5.31,745 360,910.31 235,947.24 235,1047.76 920,1120.31 1049.76,1129.45 450,1135.31
  other v2: 740,175 1085,195 1235,220 1085,265 1235,265 935,270 1235,310 935,320
  other v4: 190,140 1100,525 1285,970
LED: Q7.1 R22.2 U1.29 | length 1294.7
  Top Layer w8: v1(1139.45,764.45) 1169.5,734.4 U1.29
  Top Layer w15: R22.2 117.32,429.76 124.41,436.85 v1(135.24,436.85)
  VCC w15: v1(135.24,436.85) 381.18,436.85 633.78,689.45 1064.45,689.45 v1(1139.45,764.45)
MPU_SCL: IC1.23 R2.2 U1.42 | length 344.8
  Top Layer w8: IC1.23 824.45,620.08 859.64,620.08 cw(c859.64,549.64) 909.45,599.45 ccw(c944.82,634.82) 944.82,584.8 U1.42 U1.42@1003.85,584.45
MPU_SDA: IC1.24 R1.2 U1.43 | length 404.6
  Top Layer w8: IC1.24 724.47,639.76 724.53,639.83 730.14,639.83 R1.2@737.42,647.11 ; v6(744.45,584.45) 850.86,584.45 cw(c850.84,522.98) 884.48,574.43 ccw(c918.09,626.03) 918.09,564.45 918.15,564.45 1000.82,564.45 ccw(c1000.82,572.45) 1003.8,565.03 U1.43
  Bottom Layer w8: v6(744.45,584.45) v1(744.45,654.13)
MPWM1: Q2.1 R9.2 U1.16 | length 2419.4
  Top Layer w8: Q2.1 62.36,982.05 R9.2 75.43,994.13 89.74,1008.44 89.74,1009.43 120,1039.69 v1(120,1255) ; U1.16 1288.82,525.8 1290.4,524.22 1343.84,524.22 v1(1356.11,511.94)
  VCC w8: v1(1289.45,1174.45) 1334.45,1129.45 1334.45,595.74 1356.4,573.78 1356.11,573.49 v1(1356.11,511.94)
  Bottom Layer w8: v1(120,1255) 209.45,1344.45 1119.45,1344.45 v1(1289.45,1174.45)
MPWM2: Q1.1 R8.1 U1.17 | length 885.3
  Top Layer w8: R8.1@982.05,1136.54 v1(989.13,1129.45) 985.24,1125.55 Q1.1 ; U1.17 1276.38,544.92 1290.72,544.92 1291.19,544.45 U1.17@1291.47,544.72 ; U1.17@1291.74,545 U1.17@1291.47,544.72 ; v1(1334.17,544.72) U1.17@1291.47,544.72
  Bottom Layer w8: v1(989.13,1129.45) 1020.55,1129.45 1334.45,815.55 1334.45,544.45 v1(1334.17,544.72)
MPWM3: Q3.1 R19.1 U1.18 | length 2596.6
  Top Layer w8: Q3.1 39.45,827.05 ; v1(70,950) 39.45,919.45 39.45,827.05 ; R19.1 72.36,827.05 39.45,827.05 ; U1.18 1325.2,565.2 ccw(c1325.2,594.45) 1354.45,594.45 v1(1354.45,619.45)
  Bottom Layer w8: v1(70,950) 94.45,974.45 94.45,1264.45 190.67,1360.67 1153.23,1360.67 1359.45,1154.45 1359.45,627.16 1354.45,622.16 v1(1354.45,619.45)
MPWM4: Q4.1 R20.1 U1.19 | length 668.2
  Top Layer w8: Q4.1@980.35,879.76 Q4.1 989.13,888.54 v1(989.13,934.45) ; U1.19 1276,585 1314.25,585 v1(1314.45,585.2)
  Bottom Layer w8: v1(989.13,934.45) 1132.49,934.45 1294.45,772.49 1294.45,605.2 ccw(c1314.45,605.2) v1(1314.45,585.2)
NetBUZZER1_3: BUZZER1.3 Q6.3 | length 240.1
  Top Layer w25: v1(306.92,41.85) 341.06,41.85 342.34,43.13 343.62,41.85 Q6.3
  Bottom Layer w25: BUZZER1.3 294.39,29.39 v1(306.92,41.85) v1(306.92,41.85)
NetC1_1: C1.1 IC1.20 | length 72.8
  Top Layer w8: IC1.20 678.38,561.02 680.58,558.82 709.47,558.82 709.53,558.76 735.46,558.76 C1.1@739.45,554.76
NetC2_2: C2.2 IC1.8 R4.1 | length 153
  Top Layer w8: R4.1 C2.2 C2.2 449.07,620.08 IC1.8
NetC3_1: C3.1 IC1.10 | length 139
  Top Layer w8: C3.1 434.76,490.43 449.07,504.74 450.06,504.74 464.88,519.57 464.88,559.88 485.71,580.71 IC1.10
NetC6_1: C6.1 D1.1 M2.2 Q1.3
NetC7_1: C7.1 D2.1 M1.2 Q2.3
NetC9_2: C9.2 U1.5 Y1.2 | length 324.6
  Top Layer w8: C9.2@989.13,149.45 Y1.2@989.13,249.84 ; Y1.2@1008.74,278.86 1011.42,281.54 1048.46,281.54 1110.5,343.58 U1.5
NetC10_2: C10.2 U1.6 Y1.1 | length 314.5
  Top Layer w8: U1.6 1130.2,426.17 1129.45,425.42 1129.45,315 1134.18,310.27 1150.96,293.49 Y1.1@1150.96,288.65 ; Y1.1@1131.76,307.85 1148.54,291.07 Y1.1@1150.96,288.65 ; Y1.1@1170.16,269.45 Y1.1@1150.96,288.65 ; C10.2 Y1.1@1189.76,249.84
NetC13_1: C13.1 D3.1 M3.2 Q3.3
NetC14_1: C14.1 D4.1 M4.2 Q4.3 | length 960.7
  VCC w25: v5(1217.72,815.98) 1215.98,815.98 1190,790 1190,488.64 1278.15,400.49 1278.15,-20.63 M4.2
  other v5: 1190,770
NetC18_1: C18.1 U1.22 | length 194.5
  Top Layer w8: U1.22 1329.51,643.9 1339.45,653.84 1339.45,729.45 1324.76,744.13 C18.1
NetC23_2: C23.2 U6.10 | length 144.3
  Top Layer w8: U6.10 878.32,184.62 889.16,195.46 889.16,200.46 903.46,214.76 C23.2@908.46,214.76
NetC24_1: C24.1 U6.12 | length 73.7
  Top Layer w8: U6.12 840.21,224 C24.1@849.45,214.76
NetC24_2: C24.2 U6.8 | length 101.5
  Top Layer w8: U6.8 833.66,139.33 848.46,154.13 C24.2@849.45,154.13
NetC26_2: C26.2 IC2.3 R11.1 R15.1 | length 311.7
  Top Layer w18: R11.1@787.09,1142.4 789.69,1145 789.69,1060 839.71,1009.98 839.71,1008.99 849.02,999.69 C26.2 850,924.37 R15.1
  Top Layer w23: IC2.3 730.43,1142.71 782.4,1142.71 R11.1
NetD5_1: D5.1 IC2.1 L1.2
NetIC1_9: IC1.9 R5.2 | length 93.5
  Top Layer w8: R5.2@424.07,579.74 R5.2@425.06,579.74 ; R5.2 434.76,565.43 449.07,579.74 450.06,579.74 470.71,600.39 IC1.9
NetIC2_4: IC2.4 R7.2 | length 83.8
  Top Layer w18: R7.2@539.02,1135.32 R7.2
  Top Layer w20: R7.2 547.09,1142.4 IC2.4
NetLED2_1: LED2.1 Q7.3 | length 844.1
  Top Layer w20: Q7.3 244.45,399.45 Q7.3@245,400
  Top Layer w25: Q7.3@245,400 415,400 485,330 v3(665,330)
  Bottom Layer w10: LED2.1@945.74,177.19 950.29,164.21 LED2.1@950.29,159.8
  Bottom Layer w20: LED2.1@925.38,189.12 LED2.1
  Bottom Layer w25: v3(665,330) 830,330 925.38,234.62 LED2.1@925.38,189.12
NetQ6_1: Q6.1 R23.1 | length 81
  Top Layer w25: R23.1@175.31,80 255.28,80 Q6.1
NetR10_2: R10.2 U1.44 | length 204.3
  Top Layer w10: R10.2 800.18,545.5 U1.44
NetR14_2: R14.2 U2.7 | length 31.4
  Top Layer w8: R14.2 v1(539.45,191.83)
  Bottom Layer w8: U2.7 522.99,204.58 533.83,193.74 537.54,193.74 v1(539.45,191.83)
NetR16_2: R16.2 U7.3 | length 213.9
  Bottom Layer w10: U7.3 -154.26,847.84 -154.26,779.26 v1@-55.99,680.99
  other v1: -55,679.68
PB12: port.3 U1.25 | length 841.9
  Top Layer w8: U1.25 1248.3,723.82 1248.88,724.4 1248.88,725.72 1249.45,726.29 1249.45,739.45 1254.45,744.45 v1(1254.45,764.45)
  Bottom Layer w8: port.3 823.62,1071.49 1090.11,805 1190,805 1215,780 1238.9,780 v1(1254.45,764.45)
PB13: port.4 U1.26 | length 859.5
  Top Layer w8: U1.26 1228.6,739.15 v1(1229.16,739.7)
  Bottom Layer w8: port.4 723.62,1140.28 1124.19,739.7 v1(1229.16,739.7)
POWER: C4.1 C5.1 R3.2 R6.1 U1.10 | length 1557.4
  Top Layer w8: R3.2 280.43,-115.87 294.74,-130.17 294.74,-131.16 309.45,-145.87 R6.1 C5.1 429.76,-146.18 C4.1 518.27,-155 1135,-155 1281.69,-8.31 1281.69,317.21 1208.9,390 U1.10
RX: RX.1 U1.31 | length 1036.5
  Top Layer w10: v1(909.45,858.45) 1015.45,858.45 1130.2,743.7 U1.31
  Bottom Layer w10: RX.1@399.34,1103.55 399.34,1164.34 444.45,1209.45 559.1,1209.45 909.45,859.1 v1(909.45,858.45)
RX3: U1.33 U7.16 | length 1893.3
  Top Layer w8: v1(865,790) 867.71,790 872.71,785 1043.9,785 1090.8,738.1 U1.33
  Bottom Layer w8: U7.16 -316.2,181.2 -240,105 245,105 295,155 295,232.97 736.16,674.13 851.67,789.64 864.64,789.64 v1(865,790)
TOF_SCL: R12.2 SCL1.1 U1.45 U2.10 U5.4 U6.1 | length 1094.8
  Top Layer w10: U5.4 269.84,280 375,280 ; SCL1.1 375,280 ; R12.2@608.5,191.81 R12.2 619.99,200.31 v2(619.99,224.65) 620.72,223.93 U6.1 ; U1.45 955,525.8 ccw(c955,443.23) 896.62,501.62 735,340 cw(c590.15,484.85) 590.15,280 590.08,280 v3(427.04,280) 375,280
  Bottom Layer w10: v3(427.04,280) 428.5,278.54 U2.10 ; v2(619.99,224.65) v3(620,280)
TOF_SDA: R13.2 SDA1.1 U1.46 U2.9 U5.3 U6.16 | length 1056.2
  Top Layer w10: 259.01,251.05 cw(c259.01,265.99) 244.09,265 244.09,277.25 U5.3 242.8,297.61 cw(c267.39,297.61) 249.99,314.99 255.86,320.86 cw(c290,286.72) SDA1.1 ; 260,251.08 475,251.08 ; R13.2 475,251.08 ; U6.16 cw(c741.33,249.56) U6.16@695,250.17 ; U1.46 991.72,506.1 990.62,505 960,505 ccw(c960,435.56) 910.86,484.62 708.57,282.33 ccw(c741.33,249.56) U6.16@695,250.17 ; 475,251.08 694.09,251.08 U6.16@694.99,250.17
  Bottom Layer w10: v6(460,195) U2.9
TX3: U1.32 U7.15 | length 1762.4
  Top Layer w8: v1(867.84,859.45) 869.45,859.45 893.17,835.72 1015.5,835.72 1110.5,740.73 U1.32
  VCC w10: v1(-185,375) 5,565 326.42,565 434.76,673.35 434.76,749.76 505,820 828.39,820 v1(867.84,859.45)
  Bottom Layer w10: U7.15 -237.46,322.54 v1(-185,375) ; v1@864.45,859.45 v1(867.84,859.45)
UART2_RX: port.6 U1.13 | length 1200.4
  Top Layer w8: U1.13 1311.7,466.7 1310.05,468.35 v1(1306.65,468.35)
  Bottom Layer w8: port.6 529.69,1299.21 1306.65,522.25 v1(1306.65,468.35)
UART2_TX: port.7 U1.12 | length 1293.8
  Top Layer w8: U1.12 v1(1279.75,439.19)
  Bottom Layer w8: port.7 493.39,1229.45 574.45,1229.45 1280,523.9 1280,453.23 1280.04,453.19 1280.04,439.49 v1(1279.75,439.19)
VCC: BUZZER1.2 C6.2 C7.2 C13.2 C14.2 C19.2 C31.1 D1.2 D2.2 D3.2 D4.2 IC2.5 L1.1 LED2.2 M1.1 M2.1 M3.1 M4.1 port.1 R7.1 S1.1 | length 75.1
  Top Layer w10: L1.1@499.09,923.63 L1.1@502.72,920
  Top Layer w25: L1.1@489.69,925.78 L1.1 495,919.54 L1.1@495,885 ; port.1 port.1@1026.64,1302.23 ; D1.2 v2(1219.45,979.47)
  VCC w25: M3.1@-98.74,-140.16 M3.1@-95.44,-140.16
  Bottom Layer w25: LED2.2 LED2.2@840.5,192.72
  other v2: 1219.45,895.91 -170,994.68
  other v3: 474.27,850.73 509.27,850.73 474.39,885.73 509.27,885.73 475,920 509.88,920
Volt: POWER1.1 R3.1 S1.2
XSHUT: R17.1 U1.41 U2.5 | length 966
  Top Layer w8: v1(906.93,630) 940,630 965.5,604.5 U1.41
  Bottom Layer w8: U2.5 652.78,117.78 700,165 700,255 610,345 v1(610,395) 845,630 v1(906.93,630)
pads on no net: BUZZER1.1 IC1.2 IC1.3 IC1.4 IC1.5 IC1.6 IC1.7 IC1.12 IC1.14 IC1.15 IC1.16 IC1.17 IC1.19 IC1.21 IC1.22 IC2.6 S1.3 S1.4 S1.5 S1.18 S1.19 S1.20 S1.21 U1.2 U1.3 U1.4 U1.7 U1.11 U1.14 U1.20 U1.21 U1.27 U1.28 U1.30 U1.38 U1.39 U1.40 U2.8 U5.2 U5.5 U6.3 U6.5 U6.6 U6.7 U6.14 U6.15 U7.2 U7.4 U7.5 U7.6 U7.7 U7.13 U7.14 U7.17 U7.18 U7.19 U7.20 U7.21 U7.22

## Polygon pours and split planes (outlines as drawn)
VCC on VCC "gnd" (solid, remove dead copper, pour order 5): -505,2195 -505,2160 -995,1670 -995,-635 -540,-1090 1830,-1090 2245,-675 2205,-635 2205,1760 1770,2195
no net on VCC "gnd" (solid, remove dead copper, pour order 0): 1760,2105
GND on Top Layer "gnd" (solid, remove dead copper, pour order 32): -520,2060 -900,1680 -900,-575 -540,-935 -535,-930 1825,-930 2110,-645 2105,-640 2105,1710 1755,2060
NetC13_1 on Top Layer "gnd" (solid, remove dead copper, pour order 19): -405,900 -55,900 -55,589.57 -74.57,570 -215,570 -215,475 -135,395 -135,-95.71 -175.55,-136.26 -370,58.19 -370,150 -410,190
3.3 on Top Layer "gnd" (solid, remove dead copper, pour order 14): -80,805 140,805 170,835 170,875 195,885 210,885 405,885 465,825 465,765 270,765 80,575 -189.64,575 -189.64,695.36
VCC on Top Layer "gnd" (solid, remove dead copper, pour order 18): -116.36,470 -45,398.64 -42.71,395 -42.71,-137.71 -107.5,-202.5 -405,95 -405,1356.02 -42.71,1356.02 -42.71,590 -195,590 -195,470
NetC7_1 on Top Layer "gnd" (solid, remove dead copper, pour order 17): -150,1305 -315,1127.31 -315,1045 -275,1005 -65,1005 -65,1231.81
VCC on Top Layer "gnd" (solid, remove dead copper, pour order 24): -895,1157.5 1097.5,1157.5 1096.87,1156.87 1096.87,841.65 1391.65,841.65 2180,1630 1780,2030 -895,2030
VCC on Top Layer "gnd" (solid, remove dead copper, pour order 31): 725,-5 725,-145 1145,-145 1210,-80 1210,-5
NetC14_1 on Top Layer "gnd" (solid, remove dead copper, pour order 30): 1045,890 1045,845 1125,765 1245,765 1245,885 1240,890
5V on Top Layer "gnd" (solid, remove dead copper, pour order 13): 200,1110 200,1281.02 275,1356.02 865,1356.02 865,1025 850,1010 435,1010 355,1090 210,1090
NetC6_1 on Top Layer "gnd" (solid, remove dead copper, pour order 23): 1040,1040 1325,1325 1430,1220 1430,1205 1255,1030 1125,1030 1114.45,1019.45 1114.45,1001.01 1043.99,1001.01 1040,1005
NetC13_1 on Top Layer "gnd" (solid, remove dead copper, pour order 20): -415,185
Volt on Top Layer "gnd" (solid, remove dead copper, pour order 15): 95,35 285,35 325,-5 725,-5 800,-80 800,-155 790,-165 285,-165 180.55,-60.55 94.45,-60.55
5V on Top Layer "gnd" (solid, remove dead copper, pour order 12): 190,1110
5V on Top Layer "gnd" (solid, remove dead copper, pour order 11): 195,1180
NetD5_1 on Top Layer "gnd" (solid, remove dead copper, pour order 10): 685,1235 740.75,1235 760,1215.75 760,950 795,915 795,860 740.75,815.75 735,810 570,810 570,1020 595,1045 650,1045 663.39,1058.39 663.39,1210
VCC on Top Layer "gnd" (solid, remove dead copper, pour order 8): 440,1105 410,1075 410,860 460,810 560,810 560,1025 580,1045 580,1080 590,1090 650,1090 655.32,1095.32 655.32,1113.23 648.55,1120 580,1120 565,1105
GND on Top Layer "gnd" (solid, remove dead copper, shelved, pour order 2): 1735,2115 2115,1735 2115,-565 1710,-970 -570,-970 -1035,-505 -1035,1670 -620,2085
3.3 on Bottom Layer "gnd" (solid, remove dead copper, pour order 27): 200,1345 120,1265 120,785 230.87,674.13 736.16,674.13 875,812.97 875,1345
GND on Bottom Layer "gnd" (solid, remove dead copper, pour order 29): -550,2090 -550,2085 -915,1720 -915,-570 -590,-895 1795,-895 2125,-565 2125,1680 1725.16,2079.84
Volt on Bottom Layer "gnd" (solid, remove dead copper, pour order 28): 85,35 85,-150 170,-235 805,-235 805,-15 755,35
3.3 on Bottom Layer "gnd" (solid, remove dead copper, pour order 26): -40.62,318.84 -40,318.22 -40,200 110,200 110,320 -39.46,320
VCC on Bottom Layer "gnd" (solid, remove dead copper, pour order 22): 400,-175 855,-175 873.46,-156.54 873.46,231 816.89,231 790,204.11 790,-100.55 400,-100.55
VCC on Bottom Layer "gnd" (solid, remove dead copper, pour order 21): 809.89,224
GND on GND (split plane): 320 vertices, not listed, extent -793.12,-793.12 1974.22,1972.65
GND on GND (split plane): -191.63,1618.26 -191.62,1618.24 -191.63,1618.25 -191.64,1618.27

## Keep-outs
Keep-Out Layer:
  lines w10: -337.37,1017.74 ccw(c-474.87,1135.24) -344.45,1260.55 -811.95,1728.05 -546.95,1993.05 -545.1,1993.05 -181,1628.95 ccw(c415.55,2215.55) 440.29,1379.27 745.61,1379.27 ; -337.32,1017.68 -375,980 -375,205 -329.5,159.5 cw(c-471.95,48.05) -319.91,-49.91 -814.45,-544.45 -546.95,-811.95 -227,-492 ; -241.98,-507.29 cw(c495.51,-1214.51) 414.88,-195.91 783.92,-195.91 ; 745.69,1379.19 ccw(c767.58,2215.55) 1376.42,1641.71 ; 783.92,-197.2 cw(c769.8,-1041.73) 1313.42,-395.27 ; 1310.21,-394.11 1730.55,-814.45 1995.55,-549.45 1562.86,-116.75 ; 1376.56,1641.56 1728.05,1993.05 1993.05,1728.05 1625.57,1360.57 ; 1563.47,-116.13 cw(c2213.15,411.02) 1377.95,361.84 1377.95,812.24 cw(c2213.15,763.05) 1626.55,1359.6

## Silkscreen, mask and mechanical layers (free items; w line width, h text height)
Top Overlay:
  circle w20: c-225,235 r15
  lines w8: 180,1252.4 223.62,1296.02 223.62,1299.21 ; 260,1250 309.21,1299.21 323.62,1299.21 ; 360,1250 409.21,1299.21 423.62,1299.21 ; 465,1250 514.21,1299.21 523.62,1299.21 ; 565,1250 614.21,1299.21 623.62,1299.21 ; 660,1250 709.21,1299.21 723.62,1299.21 ; 823.62,1299.21 823.62,1286.38 860,1250 ; 923.62,1299.21 923.62,1291.38 965,1250 ; 1023.62,1299.21 1023.62,1276.38 1050,1250
  lines w20: -225.1,82.5 -255.1,112.5 -195.1,112.5 -225,82.6 ; -225,95 -225,235 -30,235 ; -24.35,235 -54.26,264.9 -54.26,204.9 -24.26,234.9 ; 454.9,752.5 455,752.5 455,752.6
  text "3 5 T2 R2 G DA    CL G V" at 165,1195 h38
  text "V G C D" at -356,666 h29 r270
  text "Z" at -250,280 h60
  text "Y" at -44.26,274.9 h60
  text "X" at -170,65 h60
  text "+" at 125,45 h60
  text "V1.3" at 700,35 h45
  text "ON" at 980.14,-209.17 h150
Bottom Overlay:
  circle w10: c515,310 r8
  circle w10: c410,310 r25
  lines w50: 1127.15,406.91 1127.15,686.91 1267.15,546.91 1127.15,406.91
  text "V G SCL SDA G R2 T2 5 3" at 1050,1195 h38
  text "GEARDRONE-F4" at 1082.78,995 h150 r90

## Text inside footprints (layer, text, board x,y; h text height)
L1: Mechanical 5 "C4.5 H3.2 W4.0 L4.5" at 459.84,815.18 h9.84
LED2: Bottom Overlay "+" at 773.5,161 h39.37 r270